# Allegro board 980XS-I6K51D-11120-1.brd

Outline 581.66 x 429.26 mm; copper layers: TOP, L02_GND, L03_DPS, L04_GND, L05_DPS, L06_GND, L07_DPS, L08_GND, L09_DPS, L10_GND, L11_DPS, L12_GND, L13_SIGNAL, L14_GND, L15_SIGNAL, L16_GND, L17_SIGNAL, L18_GND, L19_SIGNAL, L20_GND, L21_SIGNAL, L22_GND, L23_SIGNAL, L24_GND, L25_SIGNAL, L26_GND, L27_SIGNAL, L28_GND, L29_SIGNAL, L30_GND, L31_SIGNAL, L32_GND, L33_SIGNAL, L34_GND, L35_DPS, L36_UDB, L37_GND, BOTTOM. Coordinates in mm from the lower left corner of the outline.
Outline path: 0,429.26 206.45,429.26 arc(217.17,423.61) 227.89,429.26 353.77,429.26 arc(364.49,423.61) 375.21,429.26 581.66,429.26 581.66,0 301.55,0 arc(290.83,5.65) 280.11,0 0,0 0,429.26

## Placement (name value [footprint] x y rotation side)
BD5  BD120-1.5A-S4-MU  [FB0402]  543.47 239.79 270 bottom
BD9  BD120-1.5A-S4-MU  [FB0402]  224.66 243.83 270 bottom
BD21  BD120-1.5A-S4-MU  [FB0402]  222.95 232.36 0 bottom
BD1721  BD120-1.5A-S4-MU  [FB0402]  543.47 226.84 270 bottom
BD1722  BD120-1.5A-S4-MU  [FB0402]  543.09 213.5 270 bottom
BD1723  BD120-1.5A-S4-MU  [FB0402]  543.09 199.41 270 bottom
BD1728  BD120-1.5A-S4-MU  [FB0402]  245.15 273.73 180 bottom
BDB5  BD120-1.5A-S4-MU  [FB0402]  232.36 264.33 270 bottom
BDB6  BD120-1.5A-S4-MU  [FB0402]  220.55 264.33 270 bottom
BDB7  BD120-1.5A-S4-MU  [FB0402]  211.03 234.89 0 bottom
BDB8  BD120-1.5A-S4-MU  [FB0402]  211.03 246.46 0 bottom
BGA293-9X7-P0.4  REF-CODE-SOCKET  [SOCKET_CODE]  284.21 469.34 0 top
C262  0.1U-16-X7S-S2-MU  [C0201]  224.41 232.06 270 bottom
C264  NC/10U-16-X7R-S8-SS  [C0805]  243.28 276.07 0 bottom
C267  33P-50-N-S2-MU  [C0201]  236.23 224.18 270 bottom
C268  33P-50-N-S2-MU  [C0201]  235.23 224.18 270 bottom
C271  12P-50-N-S4-MU  [C0402]  240.52 270.61 90 bottom
C272  12P-50-N-S4-MU  [C0402]  240.52 272.63 270 bottom
C278  1U-10-X7S-S4-TDK  [C0402]  232.87 293.11 0 bottom
C279  1U-10-X7S-S4-TDK  [C0402]  232.87 291.92 0 bottom
C280  0.1U-16-X-S4-MU  [C0402]  232.87 290.72 0 bottom
C281  0.1U-16-X-S4-MU  [C0402]  232.87 289.53 0 bottom
C282  1U-10-X7S-S4-TDK  [C0402]  238.7 286.48 270 bottom
C283  0.1U-16-X-S4-MU  [C0402]  237.54 286.48 270 bottom
C284  1U-10-X7S-S4-TDK  [C0402]  237.62 297.85 90 bottom
C285  0.1U-16-X-S4-MU  [C0402]  238.81 297.85 90 bottom
C286  0.1U-16-X-S4-MU  [C0402]  233.82 297.35 180 bottom
C288  1000P-50-X7R-S2-MU  [C0201]  233.49 295.57 270 bottom
C289  0.1U-16-X-S4-MU  [C0402]  231.21 294.81 270 bottom
C290  NC/0.1U-16-X7R-S4-TY  [C0402]  224.35 296.03 180 bottom
C298  0.1U-16-X7S-S2-MU  [C0201]  222.95 292.65 90 bottom
C299  0.1U-16-X7S-S2-MU  [C0201]  220.02 296.97 180 bottom
C300  0.1U-16-X-S4-MU  [C0402]  220.67 290.87 270 bottom
C301  1U-10-X7S-S4-TDK  [C0402]  219.51 290.87 270 bottom
C302  10P-50-N-S2-MU  [C0201]  229.27 260.38 270 bottom
C309  10P-50-N-S2-MU  [C0201]  241.08 260.38 270 bottom
C310  10P-50-N-S2-MU  [C0201]  241.08 261.68 90 bottom
C318  10P-50-N-S2-MU  [C0201]  241.08 263.42 270 bottom
C320  10P-50-N-S2-MU  [C0201]  229.27 261.68 90 bottom
C332  2.2U-16-X7R-S6-TY  [C0603]  109.1 226.65 270 bottom
C333  0.1U-16-X-S4-MU  [C0402]  107.7 226.83 270 bottom
C334  10U-16-X7R-S8-SS  [C0805]  100.08 226.53 90 bottom
C335  0.1U-16-X-S4-MU  [C0402]  101.74 226.35 90 bottom
C336  4.7U-25-X7R-S8-TY  [C0805]  87.58 240.29 270 bottom
C337  0.1U-16-X-S4-MU  [C0402]  87.6 237.74 180 bottom
C338  4.7U-25-X7R-S8-TY  [C0805]  106 240.29 270 bottom
C339  0.1U-16-X-S4-MU  [C0402]  106.03 237.74 180 bottom
C400  2.2U-10-X-S4-MU  [C0402]  540.94 239.82 90 bottom
C401  0.1U-16-X-S4-MU  [C0402]  542.2 239.82 90 bottom
C402  4.7U-6.3-X-S4-MU  [C0402]  523.51 152.12 0 bottom
C403  22U-16-X5R-SA-SS  [C1206]  520.12 149.58 90 bottom
C404  10U-25-X-S6-MU  [C0603]  519.86 146.58 180 bottom
C405  1U-10-X7S-S4-TDK  [C0402]  520.37 145.26 180 bottom
C406  0.1U-16-X-S4-MU  [C0402]  90.42 287.53 180 bottom
C407  2.2U-10-X-S4-MU  [C0402]  82.6 288.09 270 bottom
C408  0.1U-16-X-S4-MU  [C0402]  83.74 288.09 270 bottom
C409  0.1U-16-X-S4-MU  [C0402]  73.71 296.14 0 bottom
C410  0.1U-16-X-S4-MU  [C0402]  508.66 225.73 270 bottom
C411  0.1U-16-X-S4-MU  [C0402]  498.63 233.78 0 bottom
C412  2.2U-10-X-S4-MU  [C0402]  507.51 225.73 270 bottom
C413  0.1U-16-X-S4-MU  [C0402]  515.33 225.16 180 bottom
C415  0.1U-16-X-S4-MU  [C0402]  90.42 273.81 180 bottom
C416  2.2U-10-X-S4-MU  [C0402]  82.6 274.38 270 bottom
C417  0.1U-16-X-S4-MU  [C0402]  73.71 282.43 0 bottom
C475  4.7U-6.3-X-S4-MU  [C0402]  256.72 272.09 270 bottom
C476  1U-10-X7S-S4-TDK  [C0402]  249.86 275.23 90 bottom
C477  10U-25-X-S6-MU  [C0603]  251.18 275.74 90 bottom
C478  22U-16-X5R-SA-SS  [C1206]  254.18 275.49 0 bottom
C894  0.1U-16-X-S4-MU  [C0402]  542.2 226.87 90 bottom
C895  2.2U-10-X-S4-MU  [C0402]  540.94 226.87 90 bottom
C910  0.1U-16-X-S4-MU  [C0402]  83.74 274.38 270 bottom
C922  0.1U-16-X-S4-MU  [C0402]  232.36 262.2 270 bottom
C923  0.1U-16-X-S4-MU  [C0402]  220.55 262.2 270 bottom
C924  10P-50-N-S2-MU  [C0201]  229.27 263.42 270 bottom
C955  0.1U-16-X-S4-MU  [C0402]  90.42 260.1 180 bottom
C956  2.2U-10-X-S4-MU  [C0402]  82.6 260.66 270 bottom
C957  0.1U-16-X-S4-MU  [C0402]  73.71 268.71 0 bottom
C958  0.1U-16-X-S4-MU  [C0402]  83.74 260.66 270 bottom
C983  0.1U-16-X-S4-MU  [C0402]  541.82 213.53 90 bottom
C984  2.2U-10-X-S4-MU  [C0402]  540.55 213.53 90 bottom
C985  0.1U-16-X-S4-MU  [C0402]  541.82 199.44 90 bottom
C986  2.2U-10-X-S4-MU  [C0402]  540.55 199.44 90 bottom
C1074  0.1U-16-X7S-S2-MU  [C0201_MINI]  243.6 273.98 90 bottom
C1082  0.1U-16-X-S4-MU  [C0402]  508.66 207.57 270 bottom
C1083  0.1U-16-X-S4-MU  [C0402]  248.15 224.79 0 bottom
C1085  2.2U-10-X-S4-MU  [C0402]  498.63 215.62 0 bottom
C1086  10P-50-N-S2-MU  [C0201]  214.98 255.18 0 bottom
C1087  10P-50-N-S2-MU  [C0201]  213.69 255.18 180 bottom
C1088  10P-50-N-S2-MU  [C0201]  211.94 255.18 0 bottom
C1089  0.1U-16-X-S4-MU  [C0402]  213.16 234.89 0 bottom
C1090  0.1U-16-X-S4-MU  [C0402]  213.16 246.46 0 bottom
C1091  10P-50-N-S2-MU  [C0201]  213.69 243.61 180 bottom
C1093  10P-50-N-S2-MU  [C0201]  214.98 243.61 0 bottom
CA1  0.1U-16-X-S4-MU  [C0402]  205.72 237.49 0 bottom
CA2  10U-25-X7R-SA  [C1206]  205.72 240.03 0 bottom
CA7  10U-25-X7R-SA  [C1206]  245.12 285.5 0 bottom
CA8  0.1U-16-X-S4-MU  [C0402]  245.12 283.46 0 bottom
CA19  470U-25-E-S10.4X10.4  [EC_10P3X10_S]  189.66 230.89 90 bottom
CA20  10U-25-X7R-SA  [C1206]  216.67 285.5 0 bottom
CA21  0.1U-16-X-S4-MU  [C0402]  216.67 283.46 0 bottom
CA22  10U-25-X7R-SA  [C1206]  222.76 281.43 0 bottom
CA23  0.1U-16-X-S4-MU  [C0402]  222.76 279.4 0 bottom
CA24  10U-25-X7R-SA  [C1206]  216.67 281.43 0 bottom
CA25  0.1U-16-X-S4-MU  [C0402]  216.67 279.4 0 bottom
CA26  10U-25-X7R-SA  [C1206]  235.18 281.43 0 bottom
CA27  0.1U-16-X-S4-MU  [C0402]  235.18 279.4 0 bottom
CA34  10U-25-X7R-SA  [C1206]  245.12 281.43 0 bottom
CA35  0.1U-16-X-S4-MU  [C0402]  245.12 279.4 0 bottom
CA36  0.1U-16-X-S4-MU  [C0402]  228.85 279.4 0 bottom
CA37  10U-25-X7R-SA  [C1206]  228.85 281.43 0 bottom
CA38  10U-25-X7R-SA  [C1206]  188.01 283.69 0 top
CA39  0.1U-16-X-S4-MU  [C0402]  206.26 242.54 0 top
CB1  0.1U-25-X-S6  [C0603]  416.81 133.35 0 bottom
CB2  10U-25-X7R-SA  [C1206]  416.81 130.81 0 bottom
CB3  0.1U-25-X-S6  [C0603]  560.07 133.35 0 bottom
CB4  10U-25-X7R-SA  [C1206]  560.07 130.81 0 bottom
CB5  0.1U-25-X-S6  [C0603]  560.07 295.91 180 bottom
CB6  10U-25-X7R-SA  [C1206]  560.07 298.45 180 bottom
CB7  0.1U-25-X-S6  [C0603]  424.16 290.83 180 bottom
CB8  10U-25-X7R-SA  [C1206]  424.16 293.37 180 bottom
CB9  0.1U-25-X-S6  [C0603]  164.85 133.35 0 bottom
CB10  10U-25-X7R-SA  [C1206]  164.85 130.81 0 bottom
CB11  0.1U-25-X-S6  [C0603]  157.46 290.83 180 bottom
CB12  10U-25-X7R-SA  [C1206]  157.46 293.37 180 bottom
CB13  0.1U-25-X-S6  [C0603]  21.59 133.35 0 bottom
CB14  10U-25-X7R-SA  [C1206]  21.59 130.81 0 bottom
CB15  0.1U-25-X-S6  [C0603]  21.59 295.91 180 bottom
CB16  10U-25-X7R-SA  [C1206]  21.59 298.45 180 bottom
CC1  0.1U-16-X7S-S2-MU  [C0201_MINI]  230.19 246.91 180 bottom
CC2  0.1U-16-X7S-S2-MU  [C0201_MINI]  230.5 250.48 90 bottom
CC3  0.1U-16-X7S-S2-MU  [C0201_MINI]  228.87 245.61 180 bottom
CC4  0.1U-16-X7S-S2-MU  [C0201_MINI]  230.19 246.26 180 bottom
CC5  0.1U-16-X7S-S2-MU  [C0201_MINI]  231.16 246.56 90 bottom
CC6  0.1U-16-X7S-S2-MU  [C0201_MINI]  228.87 244.96 180 bottom
CC7  0.1U-16-X7S-S2-MU  [C0201_MINI]  232.14 244.96 0 bottom
CC8  0.1U-16-X7S-S2-MU  [C0201_MINI]  230.5 243.97 270 bottom
CC9  0.1U-16-X7S-S2-MU  [C0201_MINI]  231.16 243.97 270 bottom
CC12  0.1U-16-X7S-S2-MU  [C0201_MINI]  229.86 244.62 270 bottom
CC13  0.1U-16-X7S-S2-MU  [C0201_MINI]  228.24 241.05 180 bottom
CC14  0.1U-16-X7S-S2-MU  [C0201_MINI]  231.46 245.61 0 bottom
CC15  0.1U-16-X7S-S2-MU  [C0201_MINI]  230.19 245.61 180 bottom
CC16  0.1U-16-X7S-S2-MU  [C0201_MINI]  230.84 244.96 180 bottom
CC70  0.1U-16-X7S-S2-MU  [C0201_MINI]  232.46 242.67 270 bottom
CC71  0.1U-16-X7S-S2-MU  [C0201_MINI]  235.38 243 0 bottom
CC73  0.1U-16-X7S-S2-MU  [C0201_MINI]  227.91 242.68 90 bottom
CC84  0.1U-16-X7S-S2-MU  [C0201_MINI]  233.11 250.48 90 bottom
CC85  0.1U-16-X7S-S2-MU  [C0201_MINI]  231.15 250.48 90 bottom
CC86  0.1U-16-X7S-S2-MU  [C0201_MINI]  232.46 250.48 90 bottom
CC87  0.1U-16-X7S-S2-MU  [C0201_MINI]  232.14 246.26 180 bottom
CC88  0.1U-16-X7S-S2-MU  [C0201_MINI]  233.11 244 270 bottom
CC89  0.1U-16-X7S-S2-MU  [C0201_MINI]  227.91 244.66 270 bottom
CC90  0.1U-16-X7S-S2-MU  [C0201_MINI]  231.8 250.48 90 bottom
CC91  0.1U-16-X7S-S2-MU  [C0201_MINI]  234.06 243.65 0 bottom
CC92  0.1U-16-X7S-S2-MU  [C0201_MINI]  232.45 244 270 bottom
CC96  0.1U-16-X7S-S2-MU  [C0201_MINI]  231.51 247.56 180 bottom
CC101  0.1U-16-X7S-S2-MU  [C0201_MINI]  230.84 240.4 0 bottom
CC103  0.1U-16-X7S-S2-MU  [C0201_MINI]  231.81 242.02 90 bottom
CC105  0.1U-16-X7S-S2-MU  [C0201_MINI]  232.46 240.72 270 bottom
CC112  0.1U-16-X7S-S2-MU  [C0201_MINI]  235.06 250.48 90 bottom
CC130  0.1U-16-X7S-S2-MU  [C0201_MINI]  228.24 241.7 180 bottom
CC182  0.1U-16-X7S-S2-MU  [C0201_MINI]  226.61 250.48 90 bottom
CC195  4.7U-25-X7R-S8-TY  [C0805]  187.38 280.77 0 top
CC202  0.1U-16-X7S-S2-MU  [C0201_MINI]  226.28 245.61 180 bottom
CC211  0.1U-16-X7S-S2-MU  [C0201_MINI]  230.5 242.02 90 bottom
CC212  0.1U-16-X7S-S2-MU  [C0201_MINI]  229.53 241.06 180 bottom
CC213  0.1U-16-X7S-S2-MU  [C0201_MINI]  231.16 242.02 90 bottom
CC214  0.1U-16-X7S-S2-MU  [C0201_MINI]  192.95 287.28 90 top
CC215  0.1U-16-X7S-S2-MU  [C0201_MINI]  231.81 239.42 90 bottom
CC216  0.1U-16-X7S-S2-MU  [C0201_MINI]  228.56 238.78 270 bottom
CC217  0.1U-16-X7S-S2-MU  [C0201_MINI]  194.35 287.28 90 top
CC218  0.1U-16-X7S-S2-MU  [C0201_MINI]  195.75 287.28 90 top
CC219  0.1U-16-X7S-S2-MU  [C0201_MINI]  197.15 287.28 90 top
CC220  0.1U-16-X7S-S2-MU  [C0201_MINI]  198.56 287.28 90 top
CON1  MS-PWR-CONN-30P-V3-SI6D70  [CONN_15X2_100MIL_PH_MS_V2]  24.74 150.36 90 top
CSDPS303  V93K_CSDPS_DPS32  [PG_VG93K_PF_DPS32_G1D303]  327.66 46.99 0 top
CSDPS307  V93K_CSDPS_DPS32  [PG_VG93K_PF_DPS32_G1D307]  401.32 46.99 0 top
CSDPS310  V93K_CSDPS_DPS32  [PG_VG93K_PF_DPS32_G2D310]  401.32 361.95 0 top
CSDPS314  V93K_CSDPS_DPS32  [PG_VG93K_PF_DPS32_G2D314]  327.66 361.95 0 top
CSDPS319  V93K_CSDPS_DPS32  [PG_VG93K_PF_DPS32_G3D319]  180.34 46.99 0 top
CSDPS323  V93K_CSDPS_DPS32  [PG_VG93K_PF_DPS32_G3D323]  254 46.99 0 top
CSDPS426  V93K_CSDPS  [PG_VG93K_PF_DPS32_G8D426]  254 361.95 0 top
CSDPS430  V93K_CSDPS  [PG_VG93K_PF_DPS32_G8D430]  180.34 361.95 0 top
D101  V93K_CH  [PG_VG93K_F_G1D101]  327.66 97.79 0 top
D102  V93K_CH  [PG_VG93K_F_G1D102]  327.66 77.47 0 top
D103  V93K_CH  [PG_VG93K_F_G1D103]  327.66 57.15 0 top
D104  V93K_CH  [PG_VG93K_F_G1D104]  327.66 36.83 0 top
D105  V93K_CH  [PG_VG93K_F_G1D105]  401.32 97.79 0 top
D106  V93K_CH  [PG_VG93K_F_G1D106]  401.32 77.47 0 top
D107  V93K_CH  [PG_VG93K_F_G1D107]  401.32 57.15 0 top
D108  V93K_CH  [PG_VG93K_F_G1D108]  401.32 36.83 0 top
D109  V93K_CH  [PG_VG93K_F_G2D109]  401.32 331.47 0 top
D110  V93K_CH  [PG_VG93K_F_G2D110]  401.32 351.79 0 top
D111  V93K_CH  [PG_VG93K_F_G2D111]  401.32 372.11 0 top
D112  V93K_CH  [PG_VG93K_F_G2D112]  401.32 392.43 0 top
D113  V93K_CH  [PG_VG93K_F_G2D113]  327.66 331.47 0 top
D114  V93K_CH  [PG_VG93K_F_G2D114]  327.66 351.79 0 top
D115  V93K_CH  [PG_VG93K_F_G2D115]  327.66 372.11 0 top
D116  V93K_CH  [PG_VG93K_F_G2D116]  327.66 392.43 0 top
D117  V93K_CH  [PG_VG93K_F_G3D117]  180.34 97.79 0 top
D118  V93K_CH  [PG_VG93K_F_G3D118]  180.34 77.47 0 top
D119  V93K_CH  [PG_VG93K_F_G3D119]  180.34 57.15 0 top
D120  V93K_CH  [PG_VG93K_F_G3D120]  180.34 36.83 0 top
D121  V93K_CH  [PG_VG93K_F_G3D121]  254 97.79 0 top
D122  V93K_CH  [PG_VG93K_F_G3D122]  254 77.47 0 top
D123  V93K_CH  [PG_VG93K_F_G3D123]  254 57.15 0 top
D124  V93K_CH  [PG_VG93K_F_G3D124]  254 36.83 0 top
D125  V93K_CH  [PG_VG93K_F_G4D125]  33.02 97.79 0 top
D126  V93K_CH  [PG_VG93K_F_G4D126]  33.02 77.47 0 top
D127  V93K_CH  [PG_VG93K_F_G4D127]  33.02 57.15 0 top
D128  V93K_CH  [PG_VG93K_F_G4D128]  33.02 36.83 0 top
D129  V93K_CH  [PG_VG93K_F_G4D129]  106.68 97.79 0 top
D130  V93K_CH  [PG_VG93K_F_G4D130]  106.68 77.47 0 top
D131  V93K_CH  [PG_VG93K_F_G4D131]  106.68 57.15 0 top
D132  V93K_CH  [PG_VG93K_F_G4D132]  106.68 36.83 0 top
D201  V93K_CH  [PG_VG93K_F_G5D201]  474.98 97.79 0 top
D202  V93K_CH  [PG_VG93K_F_G5D202]  474.98 77.47 0 top
D203  V93K_CH  [PG_VG93K_F_G5D203]  474.98 57.15 0 top
D204  V93K_CH  [PG_VG93K_F_G5D204]  474.98 36.83 0 top
D205  V93K_CH  [PG_VG93K_F_G5D205]  548.64 97.79 0 top
D206  V93K_CH  [PG_VG93K_F_G5D206]  548.64 77.47 0 top
D207  V93K_CH  [PG_VG93K_F_G5D207]  548.64 57.15 0 top
D208  V93K_CH  [PG_VG93K_F_G5D208]  548.64 36.83 0 top
D209  V93K_CH  [PG_VG93K_F_G6D209]  548.64 331.47 0 top
D210  V93K_CH  [PG_VG93K_F_G6D210]  548.64 351.79 0 top
D211  V93K_CH  [PG_VG93K_F_G6D211]  548.64 372.11 0 top
D212  V93K_CH  [PG_VG93K_F_G6D212]  548.64 392.43 0 top
D213  V93K_CH  [PG_VG93K_F_G6D213]  474.98 331.47 0 top
D214  V93K_CH  [PG_VG93K_F_G6D214]  474.98 351.79 0 top
D215  V93K_CH  [PG_VG93K_F_G6D215]  474.98 372.11 0 top
D216  V93K_CH  [PG_VG93K_F_G6D216]  474.98 392.43 0 top
D217  V93K_CH  [PG_VG93K_F_G7D217]  106.68 331.47 0 top
D218  V93K_CH  [PG_VG93K_F_G7D218]  106.68 351.79 0 top
D219  V93K_CH  [PG_VG93K_F_G7D219]  106.68 372.11 0 top
D220  V93K_CH  [PG_VG93K_F_G7D220]  106.68 392.43 0 top
D221  V93K_CH  [PG_VG93K_F_G7D221]  33.02 331.47 0 top
D222  V93K_CH  [PG_VG93K_F_G7D222]  33.02 351.79 0 top
D223  V93K_CH  [PG_VG93K_F_G7D223]  33.02 372.11 0 top
D224  V93K_CH  [PG_VG93K_F_G7D224]  33.02 392.43 0 top
D225  V93K_CH_ND  [PG_VG93K_F_G8D225_ND]  254 331.47 0 top
D226/D626  V93K_PS1600 HD  [PG_VG93K_F_HSM_G8D226_626_ND]  254 351.79 0 top
D227  V93K_CH  [PG_VG93K_F_G8D227]  254 372.11 0 top
D228  V93K_CH  [PG_VG93K_F_G8D228]  254 392.43 0 top
D229  V93K_CH_ND  [PG_VG93K_F_G8D229_ND]  180.34 331.47 0 top
D230/D630  V93K_PS1600 HD  [PG_VG93K_F_HSM_G8D230_630_ND]  180.34 351.79 0 top
D231  V93K_CH  [PG_VG93K_F_G8D231]  180.34 372.11 0 top
D232  V93K_CH  [PG_VG93K_F_G8D232]  180.34 392.43 0 top
D325  V93K_CH  [PG_VG93K_F_G4D325]  33.02 87.63 0 top
D326  V93K_CH  [PG_VG93K_F_G4D326]  33.02 67.31 0 top
D327  V93K_CH  [PG_VG93K_F_G4D327]  33.02 46.99 0 top
D328  V93K_CH  [PG_VG93K_F_G4D328]  33.02 26.67 0 top
D329  V93K_CH  [PG_VG93K_F_G4D329]  106.68 87.63 0 top
D330  V93K_CH  [PG_VG93K_F_G4D330]  106.68 67.31 0 top
D331  V93K_CH  [PG_VG93K_F_G4D331]  106.68 46.99 0 top
D332  V93K_CH  [PG_VG93K_F_G4D332]  106.68 26.67 0 top
D409  V93K_CH  [PG_VG93K_F_G6D409]  548.64 341.63 0 top
D410  V93K_CH  [PG_VG93K_F_G6D410]  548.64 361.95 0 top
D411  V93K_CH  [PG_VG93K_F_G6D411]  548.64 382.27 0 top
D412  V93K_CH  [PG_VG93K_F_G6D412]  548.64 402.59 0 top
D413  V93K_CH  [PG_VG93K_F_G6D413]  474.98 341.63 0 top
D414  V93K_CH  [PG_VG93K_F_G6D414]  474.98 361.95 0 top
D415  V93K_CH  [PG_VG93K_F_G6D415]  474.98 382.27 0 top
D416  V93K_CH  [PG_VG93K_F_G6D416]  474.98 402.59 0 top
D417  V93K_CH  [PG_VG93K_F_G7D417]  106.68 341.63 0 top
D418  V93K_CH  [PG_VG93K_F_G7D418]  106.68 361.95 0 top
D419  V93K_CH  [PG_VG93K_F_G7D419]  106.68 382.27 0 top
D420  V93K_CH  [PG_VG93K_F_G7D420]  106.68 402.59 0 top
D421  V93K_CH  [PG_VG93K_F_G7D421]  33.02 341.63 0 top
D422  V93K_CH  [PG_VG93K_F_G7D422]  33.02 361.95 0 top
D423  V93K_CH  [PG_VG93K_F_G7D423]  33.02 382.27 0 top
D424  V93K_CH  [PG_VG93K_F_G7D424]  33.02 402.59 0 top
D425  V93K_CH_ND  [PG_VG93K_F_G8D425_ND]  254 341.63 0 top
D427  V93K_CH  [PG_VG93K_F_G8D427]  254 382.27 0 top
D428  V93K_CH  [PG_VG93K_F_G8D428]  254 402.59 0 top
D429  V93K_CH_ND  [PG_VG93K_F_G8D429_ND]  180.34 341.63 0 top
D431  V93K_CH  [PG_VG93K_F_G8D431]  180.34 382.27 0 top
D432  V93K_CH  [PG_VG93K_F_G8D432]  180.34 402.59 0 top
DPS1  V93K_DPS  [PG_VG93K_F_G1DPS1]  401.32 16.51 0 top
DPS2  V93K_DPS  [PG_VG93K_F_G2DPS2]  327.66 412.75 0 top
DPS3  V93K_DPS  [PG_VG93K_F_G3DPS3]  254 16.51 0 top
DPS8  V93K_DPS  [PG_VG93K_F_G8DPS8]  180.34 412.75 0 top
FD1  -  [FD_040_V2]  10.16 129.54 0 top
FD2  -  [FD_040_V2]  11.43 298.45 0 top
FD3  -  [FD_040_V2]  157.48 298.45 0 top
FD4  -  [FD_040_V2]  157.48 130.81 0 top
FD5  -  [FD_040_V2]  424.18 298.45 0 top
FD6  -  [FD_040_V2]  424.18 130.81 0 top
FD7  -  [FD_040_V2]  570.23 298.45 0 top
FD8  -  [FD_040_V2]  570.23 130.81 0 top
FD9  -  [FD_040_V2]  10.16 129.54 180 bottom
FD10  -  [FD_040_V2]  11.43 298.45 180 bottom
FD11  -  [FD_040_V2]  157.48 298.45 180 bottom
FD12  -  [FD_040_V2]  157.48 130.81 180 bottom
FD13  -  [FD_040_V2]  424.18 298.45 180 bottom
FD14  -  [FD_040_V2]  424.18 130.81 180 bottom
FD15  -  [FD_040_V2]  570.23 298.45 180 bottom
FD16  -  [FD_040_V2]  570.23 130.81 180 bottom
H1  M3-HOLE  [M3_NPTH169]  158.75 241.3 0 top
H2  M3-HOLE  [M3_NPTH169]  158.75 187.96 0 top
H3  M3-HOLE  [M3_NPTH169]  422.91 241.3 0 top
H4  M3-HOLE  [M3_NPTH169]  422.91 187.96 0 top
J1  HDR-2X1-M  [JP_2P_100]  10.78 152.9 180 top
J2  HDR-2X1-M  [JP_2P_100]  14.16 152.9 180 top
JG261002WW011  REF-CODE-SOCKET  [SOCKET_CODE]  284.82 469.34 0 top
JP1  A2001WV0-4PS_V2  [CONN_S4X1_2MM_JWT]  100.37 260.08 90 top
K2  UA2-5NJ-A-V3  [RL_NECUA2_5V_V3]  119.04 248.1 90 bottom
K3  UA2-5NJ-A-V3  [RL_NECUA2_5V_V3]  112.69 248.1 90 bottom
K4  UA2-5NJ-A-V3  [RL_NECUA2_5V_V3]  106.34 248.1 90 bottom
K5  UA2-5NJ-A-V3  [RL_NECUA2_5V_V3]  99.99 248.1 90 bottom
K6  UA2-5NJ-A-V3  [RL_NECUA2_5V_V3]  93.64 248.1 90 bottom
K7  UA2-5NJ-A-V3  [RL_NECUA2_5V_V3]  87.29 248.1 90 bottom
K29  G6K-2F-Y-5V-A  [RL_G6K2F-Y_5V_OMRON]  231.89 271.62 0 bottom
K32  G6K-2F-Y-5V-A  [RL_G6K2F-Y_5V_OMRON]  235.73 231.79 270 bottom
K34  G6K-2P-Y5VDC-A  [RL_OMRONG6K2PY_5V]  166.88 269.24 90 bottom
K96  EC2-5NJ  [RL_NECEC2_10P_5V]  203.76 229.39 0 bottom
K109  G6K-2P-Y5VDC-A  [RL_OMRONG6K2PY_5V]  166.88 293.62 90 bottom
K110  G6K-2P-Y5VDC-A  [RL_OMRONG6K2PY_5V]  176.53 293.62 90 bottom
LDB1  LDG-2-S8  [LED_0805]  40.96 298.45 0 top
LOGO1  LOGO_SR_SigmaStar  [LOGO_SR_SIGMASTAR]  29.16 434.98 0 top
LOGO2  -  [LOGO_KT_KSMT]  81.21 434.37 0 top
LRB1  330-1-S6  [R0603]  42.89 298.45 180 bottom
MBD1  BD120-1.5A-S4-MU  [FB0402]  222.95 294.3 270 bottom
MK1  AQY221R2MY-V2  [RL_AQY221R2MY_5V_V2]  225.87 288.33 180 bottom
MK2  AQY221R2MY-V2  [RL_AQY221R2MY_5V_V2]  225.87 293.67 180 bottom
MK3  AQY221R2MY-V2  [RL_AQY221R2MY_5V_V2]  225.87 285.79 180 bottom
MK4  AQY221R2MY-V2  [RL_AQY221R2MY_5V_V2]  225.87 291 180 bottom
MR1  1M-1-S4  [R0402_UNBGA_V2]  236.22 286.48 270 bottom
MR2  1K-0.01-S4  [R0402_UNBGA_V2]  235.91 297.35 180 bottom
MR3  1K-0.01-S4  [R0402_UNBGA_V2]  233.82 298.37 180 bottom
MR4  1K-0.01-S4  [R0402_UNBGA_V2]  233.82 299.38 180 bottom
MR5  1K-0.01-S4  [R0402_UNBGA_V2]  235.91 299.38 0 bottom
MR6  1K-0.01-S4  [R0402_UNBGA_V2]  235.91 298.37 0 bottom
MR7  332K-1-S4  [R0402_UNBGA_V2]  235.21 285.63 90 bottom
MR8  1K-0.01-S4  [R0402_UNBGA_V2]  224.35 299.38 180 bottom
MR9  499-0.1-S4  [R0402]  224.35 298.27 180 bottom
MR10  0-5-S4  [R0402]  224.35 297.15 0 bottom
MR11  750-1-S4  [R0402]  229.3 288.97 180 bottom
MR12  360-1-S6  [R0603]  229.68 287.7 180 bottom
MR13  750-1-S4  [R0402]  229.3 294.3 180 bottom
MR14  1.2K-1-S4  [R0402]  229.05 286.43 0 bottom
MR15  360-1-S6  [R0603]  229.68 293.03 180 bottom
MR16  750-1-S4  [R0402]  229.3 291.64 180 bottom
MR17  360-1-S6  [R0603]  229.68 290.37 180 bottom
MR18  11K-0.1-S4  [R0402]  221.81 290.87 270 bottom
MR19  1K-0.01-S4  [R0402_UNBGA_V2]  222.95 290.87 90 bottom
MU1  KSMT002-0.15A-A-SC70-5  [SC70_5P]  233.15 287.63 90 bottom
MU2  KSMT004-SO8  [SO8_244X127MM]  238.06 292.02 90 bottom
MU3  KSMT003-MSOP8  [SO8_172X0P65MM]  228.92 297.48 180 bottom
MU4  MAX6070AAUT30+T-SOT23  [SOT23_6P_0P95X2P7MM_H1P45MM]  220.67 294.3 0 bottom
NOREF  -  []  262.45 171.5 0 top
NOREF#2  -  []  277.95 135.78 90 top
NOREF#3  -  []  495.12 144.71 90 top
NOREF#4  -  []  375.1 274.12 0 top
NOREF#5  -  []  271.12 243.92 90 top
NOREF#6  -  []  240.37 135.17 0 top
NOREF#7  -  []  290.61 180.7 0 top
NOREF#8  -  []  305.14 299.77 0 top
NOREF#9  -  []  369.83 203.63 90 top
NOREF#10  -  []  238.7 200.1 90 top
NOREF#11  -  []  267 202.2 0 top
NOREF#12  -  []  322.13 208.37 90 top
NOREF#13  -  []  372.7 271.22 0 top
NOREF#14  -  []  483.26 204.13 0 top
NOREF#15  -  []  493.48 250.31 90 top
NOREF#16  -  []  277.09 206.12 90 top
NOREF#17  -  []  241.4 259.88 90 top
NOREF#18  -  []  275.12 300.55 0 top
NOREF#19  -  []  240.12 262.82 0 top
NOREF#20  -  []  354.61 298.76 0 top
NOREF#21  -  []  233.08 182.62 90 top
NOREF#22  -  []  361.34 136.1 0 top
NOREF#23  -  []  272.87 184.43 0 top
NOREF#24  -  []  559.22 133.8 90 top
NOREF#25  -  []  308.09 208.12 0 top
NOREF#26  -  []  276.22 286.06 90 top
NOREF#27  -  []  243.84 272.69 90 top
NOREF#28  -  []  274.75 286.43 0 top
NOREF#29  -  []  315.3 190.05 0 top
NOREF#30  -  []  221.62 292.95 90 top
NOREF#31  -  []  317.12 200.2 0 top
NOREF#32  -  []  224.78 261.82 0 top
NOREF#33  -  []  221.62 297 90 top
NOREF#34  -  []  265.68 201.06 90 top
NOREF#35  -  []  236.16 189.57 90 top
NOREF#36  -  []  473.22 240.28 0 top
NOREF#37  -  []  294.36 181.55 0 top
NOREF#38  -  []  230.62 246.5 0 top
NOREF#39  -  []  292.45 178.82 0 top
NOREF#40  -  []  363.6 273.73 90 top
NOREF#41  -  []  347.56 144.79 90 top
NOREF#42  -  []  344.48 260.94 90 top
NOREF#43  -  []  219.33 196.13 0 top
NOREF#44  -  []  310.74 190.05 0 top
NOREF#45  -  []  353.63 140.86 0 top
NOREF#46  -  []  117.42 145.37 90 top
NOREF#47  -  []  335.38 182.3 90 top
NOREF#48  -  []  195.88 255.02 90 top
NOREF#49  -  []  493.92 142.82 0 top
NOREF#50  -  []  232.35 284.59 90 top
NOREF#51  -  []  116.75 229.07 90 top
NOREF#52  -  []  359.47 199.15 90 top
NOREF#53  -  []  522.5 149.61 0 top
NOREF#54  -  []  483.31 194.08 90 top
NOREF#55  -  []  268.52 184.61 90 top
NOREF#56  -  []  315.05 250.23 90 top
NOREF#57  -  []  238.82 199.15 0 top
NOREF#58  -  []  292.78 190.69 90 top
NOREF#59  -  []  351.6 181.11 90 top
NOREF#60  -  []  307.95 200.68 0 top
NOREF#61  -  []  331.23 176.59 90 top
NOREF#62  -  []  269.17 238.73 90 top
NOREF#63  -  []  255.1 214.12 0 top
NOREF#64  -  []  272.22 243.1 0 top
NOREF#65  -  []  273.07 243.95 90 top
NOREF#66  -  []  232.57 246.5 0 top
NOREF#67  -  []  85.29 252.35 90 top
NOREF#68  -  []  291.16 180.15 0 top
NOREF#69  -  []  511.12 228.63 90 top
NOREF#70  -  []  227.65 259.85 90 top
NOREF#71  -  []  474.43 218.56 90 top
NOREF#72  -  []  249.83 225.63 90 top
NOREF#73  -  []  361.4 259.88 90 top
NOREF#74  -  []  271.89 186.26 0 top
NOREF#75  -  []  351.11 297.8 90 top
NOREF#76  -  []  292.33 253.86 90 top
NOREF#77  -  []  348.52 184.61 90 top
NOREF#78  -  []  346.89 200.1 90 top
NOREF#79  -  []  229.86 184.37 90 top
NOREF#80  -  []  100.39 186.2 0 top
NOREF#81  -  []  194.24 257.86 0 top
NOREF#82  -  []  91.22 275.47 90 top
NOREF#83  -  []  317.95 138.45 90 top
NOREF#84  -  []  294.68 183.61 0 top
NOREF#85  -  []  308.25 234.12 0 top
NOREF#86  -  []  272.9 189.57 90 top
NOREF#87  -  []  267.25 234.3 90 top
NOREF#88  -  []  535.51 217.71 90 top
NOREF#89  -  []  33.01 2.28 90 top
NOREF#90  -  []  351.39 250.05 0 top
NOREF#91  -  []  267.9 182.43 90 top
NOREF#92  -  []  192.83 254.84 90 top
NOREF#93  -  []  311.16 241.77 90 top
NOREF#94  -  []  237.12 260.2 0 top
NOREF#95  -  []  304.52 290.37 90 top
NOREF#96  -  []  309.94 186.91 0 top
NOREF#97  -  []  59.22 255.11 0 top
NOREF#98  -  []  312.57 244.23 90 top
NOREF#99  -  []  460.48 190.01 0 top
NOREF#100  -  []  358.82 200.55 0 top
NOREF#101  -  []  232.45 243.75 90 top
NOREF#102  -  []  344.78 201.82 0 top
NOREF#103  -  []  307 259.85 0 top
NOREF#104  -  []  263.27 174.62 0 top
NOREF#105  -  []  291.34 254.86 0 top
NOREF#106  -  []  347 201.5 0 top
NOREF#107  -  []  306.54 133.3 90 top
NOREF#108  -  []  268.03 294.87 0 top
NOREF#109  -  []  362.43 209.89 0 top
NOREF#110  -  []  86.59 157.25 0 top
NOREF#111  -  []  196.91 286.85 0 top
NOREF#112  -  []  541.61 147.98 0 top
NOREF#113  -  []  97.24 246.5 90 top
NOREF#114  -  []  290.56 192.32 0 top
NOREF#115  -  []  322.33 173.13 90 top
NOREF#116  -  []  230.5 181.77 90 top
NOREF#117  -  []  268.52 244.61 90 top
NOREF#118  -  []  331.16 187.72 90 top
NOREF#119  -  []  319.47 260.55 90 top
NOREF#120  -  []  345.88 235.27 0 top
NOREF#121  -  []  85 290.19 0 top
NOREF#122  -  []  198.44 254.84 90 top
NOREF#123  -  []  301.82 296.65 90 top
NOREF#124  -  []  539.45 192.64 90 top
NOREF#125  -  []  311.27 239.68 90 top
NOREF#126  -  []  92.33 228.96 90 top
NOREF#127  -  []  315.23 223.88 90 top
NOREF#128  -  []  232.45 183.76 90 top
NOREF#129  -  []  295.71 242 90 top
NOREF#130  -  []  279.77 201.38 0 top
NOREF#131  -  []  195.88 252.99 90 top
NOREF#132  -  []  374.2 209.34 90 top
NOREF#133  -  []  346.91 141.04 90 top
NOREF#134  -  []  353.43 186.02 90 top
NOREF#135  -  []  307.75 172.44 90 top
NOREF#136  -  []  311.21 245.61 0 top
NOREF#137  -  []  463.78 224.56 0 top
NOREF#138  -  []  232.87 244.43 0 top
NOREF#139  -  []  318.22 194.4 90 top
NOREF#140  -  []  347 261.5 0 top
NOREF#141  -  []  253.99 242.3 90 top
NOREF#142  -  []  254.2 209.34 90 top
NOREF#143  -  []  194.11 282.91 90 top
NOREF#144  -  []  229.69 136.26 90 top
NOREF#145  -  []  242.33 173.13 90 top
NOREF#146  -  []  293.99 253.86 90 top
NOREF#147  -  []  237.14 138.77 90 top
NOREF#148  -  []  325.83 229.63 90 top
NOREF#149  -  []  108.69 217.95 0 top
NOREF#150  -  []  352.04 250.05 0 top
NOREF#151  -  []  211.83 266.63 0 top
NOREF#152  -  []  227 198.45 0 top
NOREF#153  -  []  224.52 288.97 0 top
NOREF#154  -  []  86.2 290.99 90 top
NOREF#155  -  []  357.09 206.12 90 top
NOREF#156  -  []  112.42 232.07 0 top
NOREF#157  -  []  272.91 241.11 90 top
NOREF#158  -  []  317.14 144.1 90 top
NOREF#159  -  []  322.43 271.37 90 top
NOREF#160  -  []  227.65 261.5 90 top
NOREF#161  -  []  275.69 208.12 90 top
NOREF#162  -  []  485.26 143.13 0 top
NOREF#163  -  []  196.91 281.87 0 top
NOREF#164  -  []  215.56 180.9 90 top
NOREF#165  -  []  227 261.5 0 top
NOREF#166  -  []  476.48 161.06 0 top
NOREF#167  -  []  117.04 220.6 90 top
NOREF#168  -  []  356.52 134.86 0 top
NOREF#169  -  []  229.96 241.3 0 top
NOREF#170  -  []  313.49 295.27 90 top
NOREF#171  -  []  466.08 223.76 0 top
NOREF#172  -  []  343.09 174.94 0 top
NOREF#173  -  []  349.96 241.3 0 top
NOREF#174  -  []  352.35 287.13 90 top
NOREF#175  -  []  473.18 221.76 0 top
NOREF#176  -  []  255.01 182 90 top
NOREF#177  -  []  224.96 136.11 90 top
NOREF#178  -  []  272.23 227.99 90 top
NOREF#179  -  []  512.28 205.74 90 top
NOREF#180  -  []  195.75 287.03 90 top
NOREF#181  -  []  281.96 270.25 0 top
NOREF#182  -  []  275.64 200.94 0 top
NOREF#183  -  []  235.64 260.94 0 top
NOREF#184  -  []  116.29 183 90 top
NOREF#185  -  []  231.15 250.23 90 top
NOREF#186  -  []  330.61 240.7 0 top
NOREF#187  -  []  353.02 254.4 0 top
NOREF#188  -  []  292.33 193.86 90 top
NOREF#189  -  []  292.96 183.2 0 top
NOREF#190  -  []  309.96 241.3 0 top
NOREF#191  -  []  274.75 285.63 90 top
NOREF#192  -  []  329.83 203.63 90 top
NOREF#193  -  []  506.73 230.34 0 top
NOREF#194  -  []  233.63 243.41 0 top
NOREF#195  -  []  320.83 157.63 90 top
NOREF#196  -  []  49.74 249.13 90 top
NOREF#197  -  []  211.16 176.15 90 top
NOREF#198  -  []  109.94 151.25 90 top
NOREF#199  -  []  85 264.21 0 top
NOREF#200  -  []  314.1 286.98 90 top
NOREF#201  -  []  458.65 136.37 90 top
NOREF#202  -  []  241.4 199.88 90 top
NOREF#203  -  []  324.17 212.99 0 top
NOREF#204  -  []  211.16 236.15 90 top
NOREF#205  -  []  234.95 182.76 0 top
NOREF#206  -  []  224.96 136.89 0 top
NOREF#207  -  []  361.57 134.52 90 top
NOREF#208  -  []  281.08 200.08 90 top
NOREF#209  -  []  103.16 162.03 0 top
NOREF#210  -  []  267.99 241.7 0 top
NOREF#211  -  []  307.05 135.87 0 top
NOREF#212  -  []  195.75 285 90 top
NOREF#213  -  []  307.25 174.3 90 top
NOREF#214  -  []  360.12 262.82 0 top
NOREF#215  -  []  470.13 161.06 0 top
NOREF#216  -  []  268.09 268.12 0 top
NOREF#217  -  []  294.66 181.23 0 top
NOREF#218  -  []  332.01 194.76 0 top
NOREF#219  -  []  195.64 259.04 90 top
NOREF#220  -  []  270.16 244.72 90 top
NOREF#221  -  []  233.02 194.4 0 top
NOREF#222  -  []  347.65 198.45 90 top
NOREF#223  -  []  198.44 255.7 0 top
NOREF#224  -  []  281.04 135.78 0 top
NOREF#225  -  []  267.56 144.79 0 top
NOREF#226  -  []  259.33 196.13 0 top
NOREF#227  -  []  512.28 223.9 90 top
NOREF#228  -  []  234.44 146.64 0 top
NOREF#229  -  []  214.66 241.23 0 top
NOREF#230  -  []  273.07 194.55 0 top
NOREF#231  -  []  105.64 189 0 top
NOREF#232  -  []  267.75 232.44 90 top
NOREF#233  -  []  332.96 254.76 0 top
NOREF#234  -  []  270.74 250.05 0 top
NOREF#235  -  []  354.82 284.84 90 top
NOREF#236  -  []  293.66 183.2 0 top
NOREF#237  -  []  212.01 194.76 0 top
NOREF#238  -  []  311.39 190.05 0 top
NOREF#239  -  []  255.58 243.29 90 top
NOREF#240  -  []  230.55 134.62 90 top
NOREF#241  -  []  213.22 238.82 90 top
NOREF#242  -  []  265.05 146.58 0 top
NOREF#243  -  []  343.95 234.46 90 top
NOREF#244  -  []  239.77 200.68 0 top
NOREF#245  -  []  293.54 250.69 90 top
NOREF#246  -  []  352.23 167.99 0 top
NOREF#247  -  []  350.59 180.4 0 top
NOREF#248  -  []  210.56 175.55 90 top
NOREF#249  -  []  214.36 243.2 0 top
NOREF#250  -  []  458.37 212.88 0 top
NOREF#251  -  []  233.63 146.07 0 top
NOREF#252  -  []  478.69 166.11 90 top
NOREF#253  -  []  365.64 136.62 90 top
NOREF#254  -  []  58.43 249.91 90 top
NOREF#255  -  []  311.6 241.11 90 top
NOREF#256  -  []  212.54 254.86 90 top
NOREF#257  -  []  59.94 196.2 0 top
NOREF#258  -  []  479.53 190.01 0 top
NOREF#259  -  []  273.11 183.76 90 top
NOREF#260  -  []  506.92 207.65 0 top
NOREF#261  -  []  332.78 239.12 90 top
NOREF#262  -  []  504.91 209.19 90 top
NOREF#263  -  []  313.63 138.2 0 top
NOREF#264  -  []  238.82 198.45 0 top
NOREF#265  -  []  232.21 244.43 0 top
NOREF#266  -  []  314.61 298.76 0 top
NOREF#267  -  []  236.7 296.96 90 top
NOREF#268  -  []  352.13 184.72 90 top
NOREF#269  -  []  473.2 165.43 90 top
NOREF#270  -  []  103.28 139.01 0 top
NOREF#271  -  []  273.73 243.95 90 top
NOREF#272  -  []  534.31 232.71 0 top
NOREF#273  -  []  87.91 201.93 90 top
NOREF#274  -  []  311.39 250.05 0 top
NOREF#275  -  []  311.78 183.92 90 top
NOREF#276  -  []  466.08 160.26 0 top
NOREF#277  -  []  277.49 201.06 90 top
NOREF#278  -  []  360.37 135.17 0 top
NOREF#279  -  []  310.5 250.23 90 top
NOREF#280  -  []  335.16 179.65 90 top
NOREF#281  -  []  87.81 196.06 90 top
NOREF#282  -  []  318.22 254.4 90 top
NOREF#283  -  []  229.27 261.38 90 top
NOREF#284  -  []  313.02 254.4 0 top
NOREF#285  -  []  215.06 194.76 0 top
NOREF#286  -  []  92.94 252.5 0 top
NOREF#287  -  []  227.75 172.44 90 top
NOREF#288  -  []  275.21 285.21 90 top
NOREF#289  -  []  321.48 268.37 0 top
NOREF#290  -  []  322.68 272.85 0 top
NOREF#291  -  []  335.58 243.29 90 top
NOREF#292  -  []  87.81 240.82 0 top
NOREF#293  -  []  560.49 154.6 0 top
NOREF#294  -  []  91.64 157.1 90 top
NOREF#295  -  []  272.04 250.05 0 top
NOREF#296  -  []  293.09 255.5 0 top
NOREF#297  -  []  45.98 272.89 0 top
NOREF#298  -  []  198.44 259.04 90 top
NOREF#299  -  []  251.16 247.72 90 top
NOREF#300  -  []  350.74 190.05 0 top
NOREF#301  -  []  334.36 243.2 0 top
NOREF#302  -  []  308.01 174.3 90 top
NOREF#303  -  []  235.3 190.05 0 top
NOREF#304  -  []  354.61 298.99 90 top
NOREF#305  -  []  274.82 285.62 0 top
NOREF#306  -  []  194.48 255.02 90 top
NOREF#307  -  []  271.26 187.56 0 top
NOREF#308  -  []  123.08 205.05 0 top
NOREF#309  -  []  482.83 256.31 0 top
NOREF#310  -  []  272.7 190.05 0 top
NOREF#311  -  []  348.52 244.61 90 top
NOREF#312  -  []  321.4 259.88 90 top
NOREF#313  -  []  313.08 180.67 90 top
NOREF#314  -  []  255.83 259.63 0 top
NOREF#315  -  []  311.6 181.11 90 top
NOREF#316  -  []  269.01 181.77 90 top
NOREF#317  -  []  235.23 223.88 90 top
NOREF#318  -  []  311.4 181.59 0 top
NOREF#319  -  []  233.07 254.55 0 top
NOREF#320  -  []  224.42 176.56 0 top
NOREF#321  -  []  475.32 205.67 90 top
NOREF#322  -  []  359.47 201.5 90 top
NOREF#323  -  []  212.45 238.82 0 top
NOREF#324  -  []  325.83 169.63 90 top
NOREF#325  -  []  230.16 244.72 90 top
NOREF#326  -  []  243.6 213.73 90 top
NOREF#327  -  []  227.67 185.09 0 top
NOREF#328  -  []  40.05 272.89 0 top
NOREF#329  -  []  104.54 154.45 0 top
NOREF#330  -  []  253.09 255.5 0 top
NOREF#331  -  []  250.61 175.6 90 top
NOREF#332  -  []  227.57 245.37 90 top
NOREF#333  -  []  271.11 296.5 90 top
NOREF#334  -  []  103.28 141.55 0 top
NOREF#335  -  []  264.52 291.64 0 top
NOREF#336  -  []  227.91 182.43 90 top
NOREF#337  -  []  474 165.84 0 top
NOREF#338  -  []  306.03 185.61 0 top
NOREF#339  -  []  128.92 417.57 90 top
NOREF#340  -  []  363.33 272.85 90 top
NOREF#341  -  []  270.55 134.62 90 top
NOREF#342  -  []  115.81 278.82 90 top
NOREF#343  -  []  561.7 171.5 0 top
NOREF#344  -  []  103.59 151.25 90 top
NOREF#345  -  []  333.54 179.12 90 top
NOREF#346  -  []  319.77 261.38 0 top
NOREF#347  -  []  307.95 263.72 0 top
NOREF#348  -  []  276.89 133.69 0 top
NOREF#349  -  []  356.29 260.94 90 top
NOREF#350  -  []  48.16 249.91 0 top
NOREF#351  -  []  340.83 211.63 0 top
NOREF#352  -  []  90.89 246.5 90 top
NOREF#353  -  []  469.03 190.01 0 top
NOREF#354  -  []  351.6 249.57 90 top
NOREF#355  -  []  242.13 208.37 90 top
NOREF#356  -  []  228.67 181.95 0 top
NOREF#357  -  []  211.83 230.23 315 top
NOREF#358  -  []  103.64 166.09 0 top
NOREF#359  -  []  267.09 206.12 0 top
NOREF#360  -  []  379.9 268.32 90 top
NOREF#361  -  []  279.77 199.98 0 top
NOREF#362  -  []  454.13 158.26 0 top
NOREF#363  -  []  481.53 192.66 90 top
NOREF#364  -  []  335.58 194.86 90 top
NOREF#365  -  []  283.6 213.73 90 top
NOREF#366  -  []  210.61 192.27 0 top
NOREF#367  -  []  269.17 178.73 90 top
NOREF#368  -  []  462.48 256.16 90 top
NOREF#369  -  []  242.43 269.89 0 top
NOREF#370  -  []  230.59 184.96 0 top
NOREF#371  -  []  239.47 199.15 90 top
NOREF#372  -  []  352.26 245.64 90 top
NOREF#373  -  []  560.92 149.79 90 top
NOREF#374  -  []  222.45 231.5 0 top
NOREF#375  -  []  347.99 181.7 0 top
NOREF#376  -  []  303.95 173.34 90 top
NOREF#377  -  []  351.78 183.92 90 top
NOREF#378  -  []  279.1 142.99 90 top
NOREF#379  -  []  480.26 179.13 0 top
NOREF#380  -  []  267.21 199.8 90 top
NOREF#381  -  []  333.09 243.29 90 top
NOREF#382  -  []  315.64 200.94 0 top
NOREF#383  -  []  229.53 240.81 90 top
NOREF#384  -  []  303.83 260.94 0 top
NOREF#385  -  []  108.69 154.45 0 top
NOREF#386  -  []  276.61 288.05 0 top
NOREF#387  -  []  505.85 229.95 0 top
NOREF#388  -  []  212.96 194.76 0 top
NOREF#389  -  []  241.08 260.08 90 top
NOREF#390  -  []  108.69 249.7 0 top
NOREF#391  -  []  463.78 256.31 0 top
NOREF#392  -  []  281.96 210.25 0 top
NOREF#393  -  []  269.53 181.46 90 top
NOREF#394  -  []  547.86 196.96 0 top
NOREF#395  -  []  265.48 235.27 0 top
NOREF#396  -  []  241.77 213.73 90 top
NOREF#397  -  []  320.04 140.12 0 top
NOREF#398  -  []  268.09 208.12 0 top
NOREF#399  -  []  549.44 225.14 90 top
NOREF#400  -  []  232.23 227.99 0 top
NOREF#401  -  []  213.54 190.69 90 top
NOREF#402  -  []  311.6 189.57 90 top
NOREF#403  -  []  229.94 246.91 0 top
NOREF#404  -  []  229.3 245.2 0 top
NOREF#405  -  []  266.54 134.08 0 top
NOREF#406  -  []  260.83 211.63 0 top
NOREF#407  -  []  540.03 233.63 0 top
NOREF#408  -  []  231.89 186.26 0 top
NOREF#409  -  []  347.65 258.45 90 top
NOREF#410  -  []  460.48 253.51 0 top
NOREF#411  -  []  213.09 195.5 0 top
NOREF#412  -  []  240.76 199.88 0 top
NOREF#413  -  []  235.23 163.88 90 top
NOREF#414  -  []  549.55 170.72 0 top
NOREF#415  -  []  362.33 173.13 90 top
NOREF#416  -  []  306.84 149.01 0 top
NOREF#417  -  []  348.01 233.3 90 top
NOREF#418  -  []  224.47 291.41 90 top
NOREF#419  -  []  81.69 288.47 90 top
NOREF#420  -  []  240.83 217.63 90 top
NOREF#421  -  []  85.83 175.34 90 top
NOREF#422  -  []  568.42 149.79 0 top
NOREF#423  -  []  281.77 213.73 90 top
NOREF#424  -  []  232.35 289.79 90 top
NOREF#425  -  []  275.12 299.54 0 top
NOREF#426  -  []  228.31 202.82 0 top
NOREF#427  -  []  241.44 273.43 90 top
NOREF#428  -  []  549.44 223.75 90 top
NOREF#429  -  []  228.53 184.61 90 top
NOREF#430  -  []  277.14 138.77 90 top
NOREF#431  -  []  219.12 300.75 0 top
NOREF#432  -  []  546.96 210.74 0 top
NOREF#433  -  []  547.86 208.27 0 top
NOREF#434  -  []  547.34 237.02 0 top
NOREF#435  -  []  570 165.52 90 top
NOREF#436  -  []  270.5 250.23 90 top
NOREF#437  -  []  549.44 233.91 90 top
NOREF#438  -  []  276.59 201.82 0 top
NOREF#439  -  []  310.5 181.77 90 top
NOREF#440  -  []  255.06 194.76 0 top
NOREF#441  -  []  117.24 217.95 0 top
NOREF#442  -  []  456.13 160.91 90 top
NOREF#443  -  []  271.48 186.67 90 top
NOREF#444  -  []  278.82 262.2 0 top
NOREF#445  -  []  460.48 221.76 0 top
NOREF#446  -  []  293.39 195.18 0 top
NOREF#447  -  []  304.41 231.76 90 top
NOREF#448  -  []  462.89 232.77 90 top
NOREF#449  -  []  292.66 253.56 90 top
NOREF#450  -  []  350.47 244.57 90 top
NOREF#451  -  []  231.4 190.05 0 top
NOREF#452  -  []  309.17 178.73 90 top
NOREF#453  -  []  271.89 244.96 0 top
NOREF#454  -  []  227.56 144.79 90 top
NOREF#455  -  []  272.8 187.32 90 top
NOREF#456  -  []  488.08 190.01 0 top
NOREF#457  -  []  268.67 181.95 0 top
NOREF#458  -  []  304.52 287.7 90 top
NOREF#459  -  []  310.74 181.59 0 top
NOREF#460  -  []  99.29 220.75 0 top
NOREF#461  -  []  229.53 241.46 90 top
NOREF#462  -  []  241.96 210.25 0 top
NOREF#463  -  []  495.12 237.42 90 top
NOREF#464  -  []  238.71 141.78 90 top
NOREF#465  -  []  321.77 273.73 90 top
NOREF#466  -  []  350.5 183.72 90 top
NOREF#467  -  []  228.95 262.82 90 top
NOREF#468  -  []  483.31 130.58 90 top
NOREF#469  -  []  104.66 130.4 0 top
NOREF#470  -  []  318.37 199.8 0 top
NOREF#471  -  []  303.09 172.9 0 top
NOREF#472  -  []  508.11 209.79 90 top
NOREF#473  -  []  195.64 257.86 0 top
NOREF#474  -  []  503.71 209.84 0 top
NOREF#475  -  []  308.09 208.12 0 top
NOREF#476  -  []  345.68 261.06 90 top
NOREF#477  -  []  480.78 250.31 90 top
NOREF#478  -  []  317.62 200.2 90 top
NOREF#479  -  []  290.61 187.17 90 top
NOREF#480  -  []  323.6 273.73 90 top
NOREF#481  -  []  267 199.85 0 top
NOREF#482  -  []  226.54 134.31 90 top
NOREF#483  -  []  251.16 191.72 0 top
NOREF#484  -  []  236.23 163.88 90 top
NOREF#485  -  []  253.22 178.82 90 top
NOREF#486  -  []  480.78 218.56 90 top
NOREF#487  -  []  276.23 130.83 90 top
NOREF#488  -  []  255.58 183.29 90 top
NOREF#489  -  []  362.43 273.73 0 top
NOREF#490  -  []  347.95 263.03 0 top
NOREF#491  -  []  488.08 253.51 0 top
NOREF#492  -  []  233.07 194.55 0 top
NOREF#493  -  []  55.64 248.1 0 top
NOREF#494  -  []  95.99 186.2 0 top
NOREF#495  -  []  114.29 156.45 0 top
NOREF#496  -  []  267.95 202.07 0 top
NOREF#497  -  []  215.16 251.22 90 top
NOREF#498  -  []  272.7 250.05 0 top
NOREF#499  -  []  348.95 199.88 0 top
NOREF#500  -  []  560.92 164.1 90 top
NOREF#501  -  []  491.48 255.51 0 top
NOREF#502  -  []  478.69 229.61 90 top
NOREF#503  -  []  215.58 183.29 90 top
NOREF#504  -  []  259.9 208.32 90 top
NOREF#505  -  []  230.16 185.37 90 top
NOREF#506  -  []  239.1 143.77 0 top
NOREF#507  -  []  213.66 183.2 0 top
NOREF#508  -  []  271.27 179.68 90 top
NOREF#509  -  []  227.21 259.8 90 top
NOREF#510  -  []  97.99 252.35 90 top
NOREF#511  -  []  325.95 213.47 0 top
NOREF#512  -  []  277.14 141.43 90 top
NOREF#513  -  []  223.09 174.38 0 top
NOREF#514  -  []  541.61 150.18 0 top
NOREF#515  -  []  231.4 241.59 0 top
NOREF#516  -  []  198.44 253.67 0 top
NOREF#517  -  []  342.45 231.5 0 top
NOREF#518  -  []  351.39 190.05 0 top
NOREF#519  -  []  320.76 202.82 90 top
NOREF#520  -  []  540.94 233.23 90 top
NOREF#521  -  []  230.62 247.15 0 top
NOREF#522  -  []  227.99 181.7 0 top
NOREF#523  -  []  351.89 184.96 0 top
NOREF#524  -  []  267.9 244.41 90 top
NOREF#525  -  []  224.52 287.7 90 top
NOREF#526  -  []  226.54 135.09 0 top
NOREF#527  -  []  311.27 179.68 90 top
NOREF#528  -  []  476.48 192.81 0 top
NOREF#529  -  []  351.8 190.23 90 top
NOREF#530  -  []  349.11 172.64 90 top
NOREF#531  -  []  347 199.15 0 top
NOREF#532  -  []  451.08 224.56 0 top
NOREF#533  -  []  254.66 252.79 0 top
NOREF#534  -  []  460.48 158.26 0 top
NOREF#535  -  []  493.92 208.86 0 top
NOREF#536  -  []  272.46 182.42 90 top
NOREF#537  -  []  192.83 257.86 0 top
NOREF#538  -  []  225.48 175.27 0 top
NOREF#539  -  []  263.95 172.42 90 top
NOREF#540  -  []  194.35 285 90 top
NOREF#541  -  []  279.59 140.38 90 top
NOREF#542  -  []  267.99 241.05 0 top
NOREF#543  -  []  334.68 183.61 0 top
NOREF#544  -  []  197.15 283.09 90 top
NOREF#545  -  []  214.38 243.29 0 top
NOREF#546  -  []  308.52 184.61 90 top
NOREF#547  -  []  229.27 263.12 90 top
NOREF#548  -  []  313.63 146.07 0 top
NOREF#549  -  []  269.27 263.12 90 top
NOREF#550  -  []  306.36 254.55 90 top
NOREF#551  -  []  548.65 417.57 90 top
NOREF#552  -  []  306.63 181.83 90 top
NOREF#553  -  []  280.12 259.78 0 top
NOREF#554  -  []  254.68 243.61 0 top
NOREF#555  -  []  267.09 266.12 0 top
NOREF#556  -  []  230.55 134.62 0 top
NOREF#557  -  []  280.79 213.43 0 top
NOREF#558  -  []  310.5 241.77 90 top
NOREF#559  -  []  274.49 182.93 90 top
NOREF#560  -  []  279.77 260.68 0 top
NOREF#561  -  []  252.54 254.86 90 top
NOREF#562  -  []  272.8 247.31 90 top
NOREF#563  -  []  230.41 240.16 0 top
NOREF#564  -  []  350.62 246.5 0 top
NOREF#565  -  []  346.36 254.55 90 top
NOREF#566  -  []  115.04 186.2 0 top
NOREF#567  -  []  123.08 173.3 0 top
NOREF#568  -  []  482.83 161.06 0 top
NOREF#569  -  []  281.4 199.88 90 top
NOREF#570  -  []  194.24 252.81 90 top
NOREF#571  -  []  312.04 190.05 0 top
NOREF#572  -  []  253.29 193.86 90 top
NOREF#573  -  []  294.68 193.86 90 top
NOREF#574  -  []  217.83 192.37 0 top
NOREF#575  -  []  350.5 243.72 90 top
NOREF#576  -  []  350.16 185.37 90 top
NOREF#577  -  []  102.34 186.2 0 top
NOREF#578  -  []  476.48 161.06 0 top
NOREF#579  -  []  311.11 297.8 90 top
NOREF#580  -  []  232.46 250.23 90 top
NOREF#581  -  []  198.68 259.22 90 top
NOREF#582  -  []  353.4 298.37 0 top
NOREF#583  -  []  226.84 148.23 90 top
NOREF#584  -  []  316.52 134.08 90 top
NOREF#585  -  []  279.77 200.68 0 top
NOREF#586  -  []  466.83 221.76 0 top
NOREF#587  -  []  79.1 263.26 0 top
NOREF#588  -  []  313.62 183.41 0 top
NOREF#589  -  []  306.6 250.23 90 top
NOREF#590  -  []  285.95 273.47 0 top
NOREF#591  -  []  351.89 246.26 0 top
NOREF#592  -  []  335.71 242 90 top
NOREF#593  -  []  210.56 247.12 90 top
NOREF#594  -  []  224.48 200.94 90 top
NOREF#595  -  []  261.26 254.55 0 top
NOREF#596  -  []  350.16 244.72 90 top
NOREF#597  -  []  369.83 203.63 90 top
NOREF#598  -  []  236.11 164.14 90 top
NOREF#599  -  []  233.17 296.17 0 top
NOREF#600  -  []  319.77 199.98 0 top
NOREF#601  -  []  238.82 199.85 0 top
NOREF#602  -  []  97.99 188.85 90 top
NOREF#603  -  []  268.25 173.12 0 top
NOREF#604  -  []  235.69 208.12 90 top
NOREF#605  -  []  295.16 191.22 90 top
NOREF#606  -  []  475.32 142.17 90 top
NOREF#607  -  []  553.49 163.32 90 top
NOREF#608  -  []  316.7 297.74 0 top
NOREF#609  -  []  213.09 255.5 0 top
NOREF#610  -  []  334.36 181.55 0 top
NOREF#611  -  []  355.81 182.28 90 top
NOREF#612  -  []  272.23 227.99 0 top
NOREF#613  -  []  313.07 243.95 90 top
NOREF#614  -  []  265.44 146.16 90 top
NOREF#615  -  []  451.08 161.06 0 top
NOREF#616  -  []  303.95 174.46 90 top
NOREF#617  -  []  348.49 136.9 0 top
NOREF#618  -  []  85.49 154.45 0 top
NOREF#619  -  []  103.59 214.75 90 top
NOREF#620  -  []  231.48 245.37 90 top
NOREF#621  -  []  224.09 232.66 0 top
NOREF#622  -  []  215.58 194.86 90 top
NOREF#623  -  []  266.33 150.83 0 top
NOREF#624  -  []  351.48 186.02 90 top
NOREF#625  -  []  343.27 235.18 0 top
NOREF#626  -  []  250.61 240.7 0 top
NOREF#627  -  []  232.46 190.23 90 top
NOREF#628  -  []  269.11 232.64 90 top
NOREF#629  -  []  348.09 268.12 0 top
NOREF#630  -  []  268.09 268.12 0 top
NOREF#631  -  []  311.48 186.67 90 top
NOREF#632  -  []  475.5 165.96 0 top
NOREF#633  -  []  338.44 299.07 0 top
NOREF#634  -  []  313.56 189.57 90 top
NOREF#635  -  []  255.71 242 90 top
NOREF#636  -  []  352.26 181.11 90 top
NOREF#637  -  []  271.12 183.92 90 top
NOREF#638  -  []  254.31 182 90 top
NOREF#639  -  []  547.34 238.42 0 top
NOREF#640  -  []  87.81 145.57 0 top
NOREF#641  -  []  252.96 183.2 0 top
NOREF#642  -  []  120.64 188.2 0 top
NOREF#643  -  []  346.36 194.55 90 top
NOREF#644  -  []  283.33 212.85 90 top
NOREF#645  -  []  352.23 230.19 90 top
NOREF#646  -  []  332.45 238.82 0 top
NOREF#647  -  []  452.74 2.28 90 top
NOREF#648  -  []  360.76 199.78 90 top
NOREF#649  -  []  559.34 148.37 0 top
NOREF#650  -  []  214.38 254.86 0 top
NOREF#651  -  []  229.94 186.26 0 top
NOREF#652  -  []  83.29 154.45 0 top
NOREF#653  -  []  350.16 184.72 90 top
NOREF#654  -  []  250.56 180.75 0 top
NOREF#655  -  []  122.64 183 90 top
NOREF#656  -  []  272.22 241.15 0 top
NOREF#657  -  []  353.34 250.05 0 top
NOREF#658  -  []  80.24 220.75 0 top
NOREF#659  -  []  268.03 287 0 top
NOREF#660  -  []  343.83 200.94 0 top
NOREF#661  -  []  346.84 250.05 0 top
NOREF#662  -  []  300.83 271.63 0 top
NOREF#663  -  []  48.16 247.71 0 top
NOREF#664  -  []  360.12 259.78 0 top
NOREF#665  -  []  211.16 187.72 90 top
NOREF#666  -  []  254.36 181.55 0 top
NOREF#667  -  []  498.43 213.47 90 top
NOREF#668  -  []  344.48 200.94 90 top
NOREF#669  -  []  359.47 202.2 90 top
NOREF#670  -  []  212.33 193.86 90 top
NOREF#671  -  []  80.24 157.25 0 top
NOREF#672  -  []  481.73 190.01 0 top
NOREF#673  -  []  227.65 260.55 90 top
NOREF#674  -  []  267 201.5 0 top
NOREF#675  -  []  267.65 259.15 90 top
NOREF#676  -  []  273.02 254.4 0 top
NOREF#677  -  []  347.65 201.5 90 top
NOREF#678  -  []  255.56 240.9 90 top
NOREF#679  -  []  363.84 272.69 90 top
NOREF#680  -  []  232.91 238.51 90 top
NOREF#681  -  []  307.95 262.07 0 top
NOREF#682  -  []  343.27 292.05 0 top
NOREF#683  -  []  315.69 208.12 90 top
NOREF#684  -  []  344.52 285.16 90 top
NOREF#685  -  []  534.61 222.87 0 top
NOREF#686  -  []  307.56 144.79 90 top
NOREF#687  -  []  213.09 243.93 0 top
NOREF#688  -  []  321.44 273.43 90 top
NOREF#689  -  []  192.71 283.77 0 top
NOREF#690  -  []  213.54 239.12 90 top
NOREF#691  -  []  269.28 181.06 0 top
NOREF#692  -  []  310.55 134.62 90 top
NOREF#693  -  []  266.54 135.09 0 top
NOREF#694  -  []  352.04 190.05 0 top
NOREF#695  -  []  271.39 250.05 0 top
NOREF#696  -  []  323.84 212.69 90 top
NOREF#697  -  []  250.56 187.12 90 top
NOREF#698  -  []  475.32 208.21 90 top
NOREF#699  -  []  267.65 259.85 90 top
NOREF#700  -  []  236.59 202.58 0 top
NOREF#701  -  []  355.64 260.94 0 top
NOREF#702  -  []  239.73 246.59 0 top
NOREF#703  -  []  210.61 187.17 90 top
NOREF#704  -  []  307.65 261.5 90 top
NOREF#705  -  []  347.65 199.15 90 top
NOREF#706  -  []  330.56 252.32 0 top
NOREF#707  -  []  352.25 249.57 90 top
NOREF#708  -  []  84.1 289.86 0 top
NOREF#709  -  []  110.89 249.7 0 top
NOREF#710  -  []  481.73 221.76 0 top
NOREF#711  -  []  230.16 184.72 90 top
NOREF#712  -  []  456.33 158.26 0 top
NOREF#713  -  []  239.47 260.55 90 top
NOREF#714  -  []  310.26 184.4 0 top
NOREF#715  -  []  371.23 176.59 90 top
NOREF#716  -  []  358.57 171.63 90 top
NOREF#717  -  []  509.02 228.95 0 top
NOREF#718  -  []  346.63 187.43 0 top
NOREF#719  -  []  225.68 261.06 90 top
NOREF#720  -  []  227.65 259.15 90 top
NOREF#721  -  []  323.96 287.7 90 top
NOREF#722  -  []  215.56 252.47 90 top
NOREF#723  -  []  319.47 201.5 90 top
NOREF#724  -  []  309.69 136.26 90 top
NOREF#725  -  []  87.81 132.56 90 top
NOREF#726  -  []  229.01 241.77 90 top
NOREF#727  -  []  231.81 181.77 90 top
NOREF#728  -  []  314.91 164.78 0 top
NOREF#729  -  []  231.8 190.23 90 top
NOREF#730  -  []  232.91 241.11 90 top
NOREF#731  -  []  231.4 250.05 0 top
NOREF#732  -  []  347.75 172.44 90 top
NOREF#733  -  []  490.28 253.51 0 top
NOREF#734  -  []  214.66 181.23 0 top
NOREF#735  -  []  84.1 276.15 0 top
NOREF#736  -  []  508.12 207 90 top
NOREF#737  -  []  263.95 234.46 90 top
NOREF#738  -  []  192.71 282.91 90 top
NOREF#739  -  []  228.31 262.82 0 top
NOREF#740  -  []  313.07 194.55 0 top
NOREF#741  -  []  236.7 297.74 0 top
NOREF#742  -  []  268.62 184.96 0 top
NOREF#743  -  []  526.28 144.71 90 top
NOREF#744  -  []  225.44 146.16 90 top
NOREF#745  -  []  451.08 256.31 0 top
NOREF#746  -  []  312.23 167.99 90 top
NOREF#747  -  []  233.56 249.57 90 top
NOREF#748  -  []  273.62 204.2 0 top
NOREF#749  -  []  342.22 296.45 90 top
NOREF#750  -  []  213.22 191.59 0 top
NOREF#751  -  []  361.4 199.88 90 top
NOREF#752  -  []  231.78 243.92 90 top
NOREF#753  -  []  462.68 253.51 0 top
NOREF#754  -  []  553.49 149.01 90 top
NOREF#755  -  []  312.23 227.99 90 top
NOREF#756  -  []  267.95 201.38 0 top
NOREF#757  -  []  343.95 174.46 90 top
NOREF#758  -  []  261.62 292.95 90 top
NOREF#759  -  []  312.35 284.59 90 top
NOREF#760  -  []  122.18 170.43 0 top
NOREF#761  -  []  225.29 172.02 90 top
NOREF#762  -  []  472.43 223.76 0 top
NOREF#763  -  []  342.56 290.08 90 top
NOREF#764  -  []  320.76 259.78 90 top
NOREF#765  -  []  86.59 220.75 0 top
NOREF#766  -  []  227.56 144.79 0 top
NOREF#767  -  []  349.61 185.05 0 top
NOREF#768  -  []  273.43 186.02 90 top
NOREF#769  -  []  359.1 142.99 90 top
NOREF#770  -  []  238.82 258.45 0 top
NOREF#771  -  []  349.53 240.81 90 top
NOREF#772  -  []  269.3 185.2 0 top
NOREF#773  -  []  95.99 249.7 0 top
NOREF#774  -  []  353.1 183.76 90 top
